# Altium PCB Main.PcbDoc
Units mm, origin at the board's own origin, x right, y up, seen from the top; angles counter-clockwise.
Board outline 40 x 50 mm, 2 copper layers (Top Layer, Bottom Layer), stack 1.135 mm thick; 38 components, 19 nets, 113 pads, 127 vias.
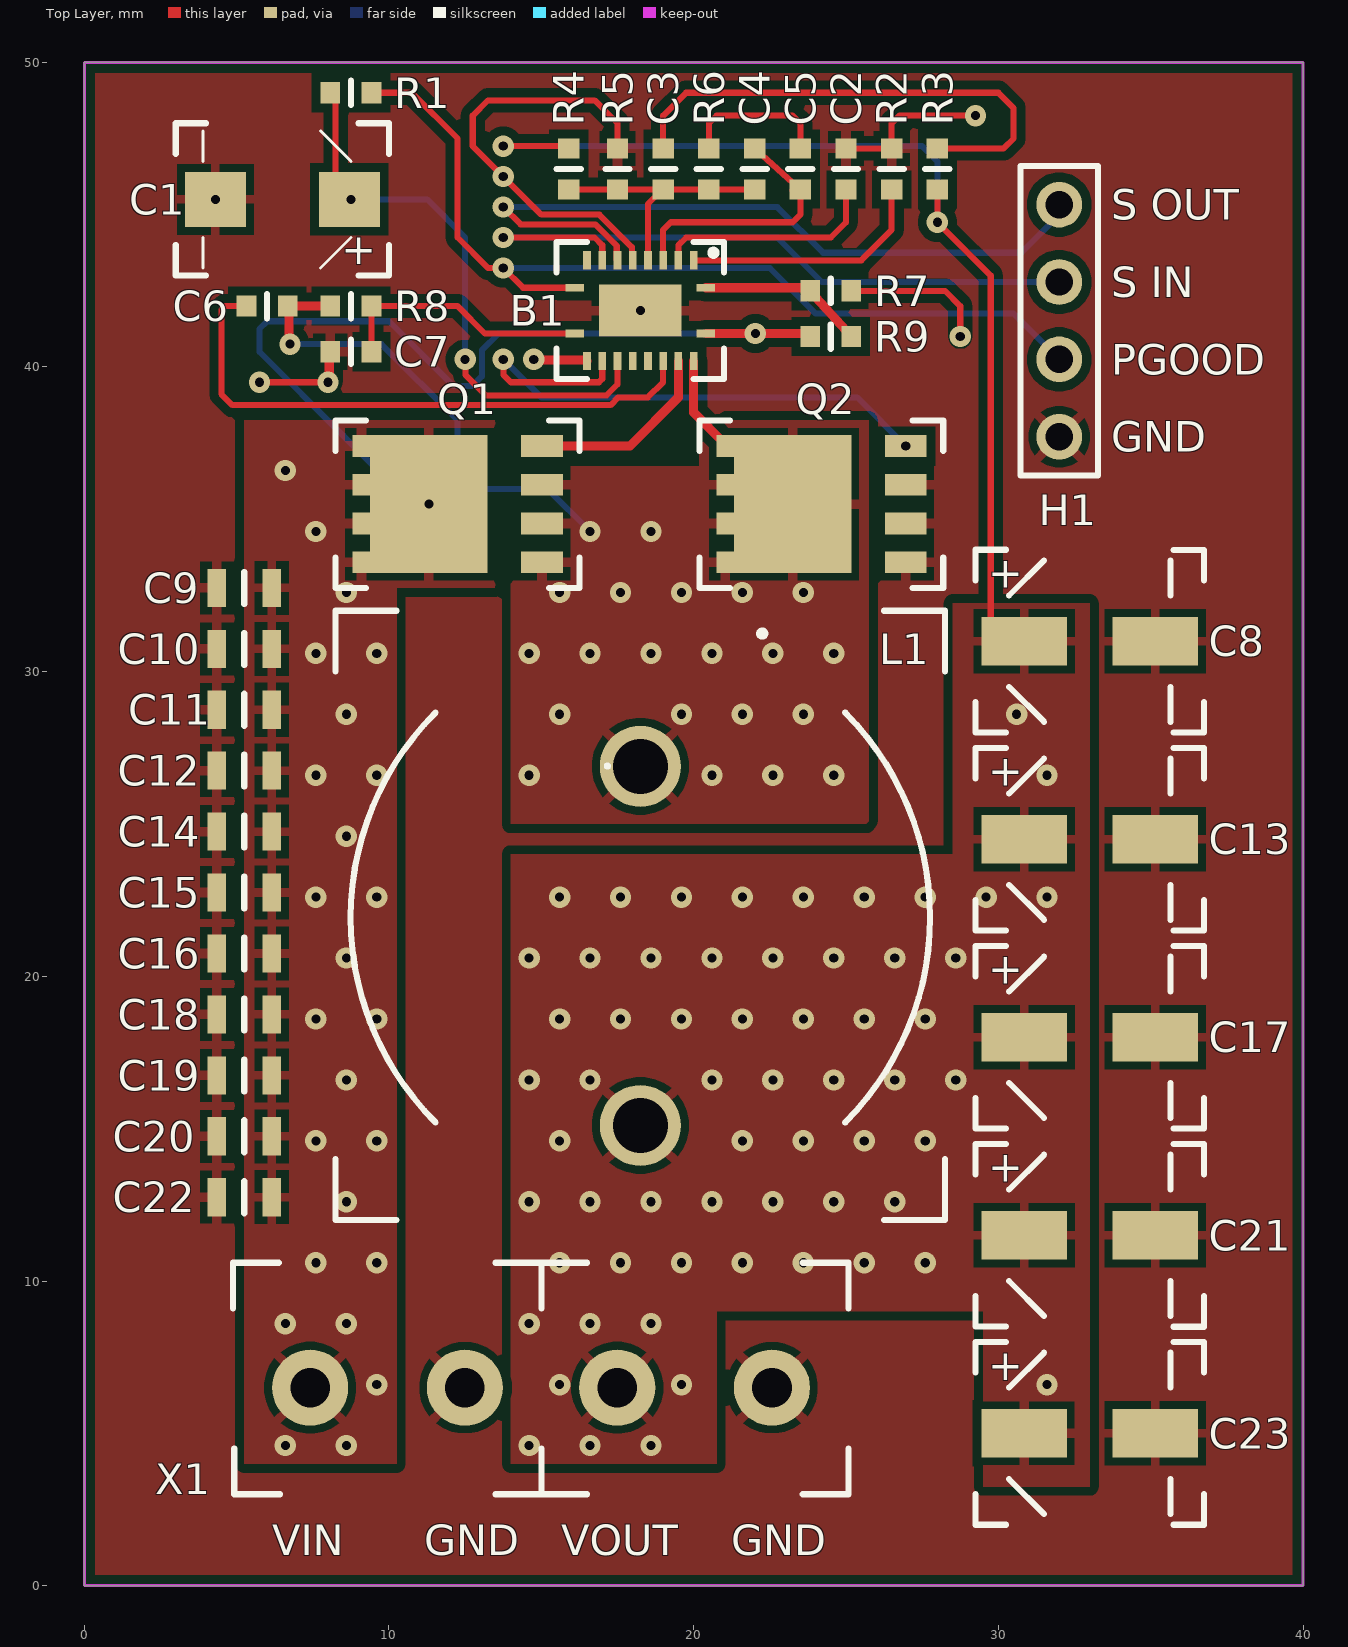
[diagram p0: Top Layer view]
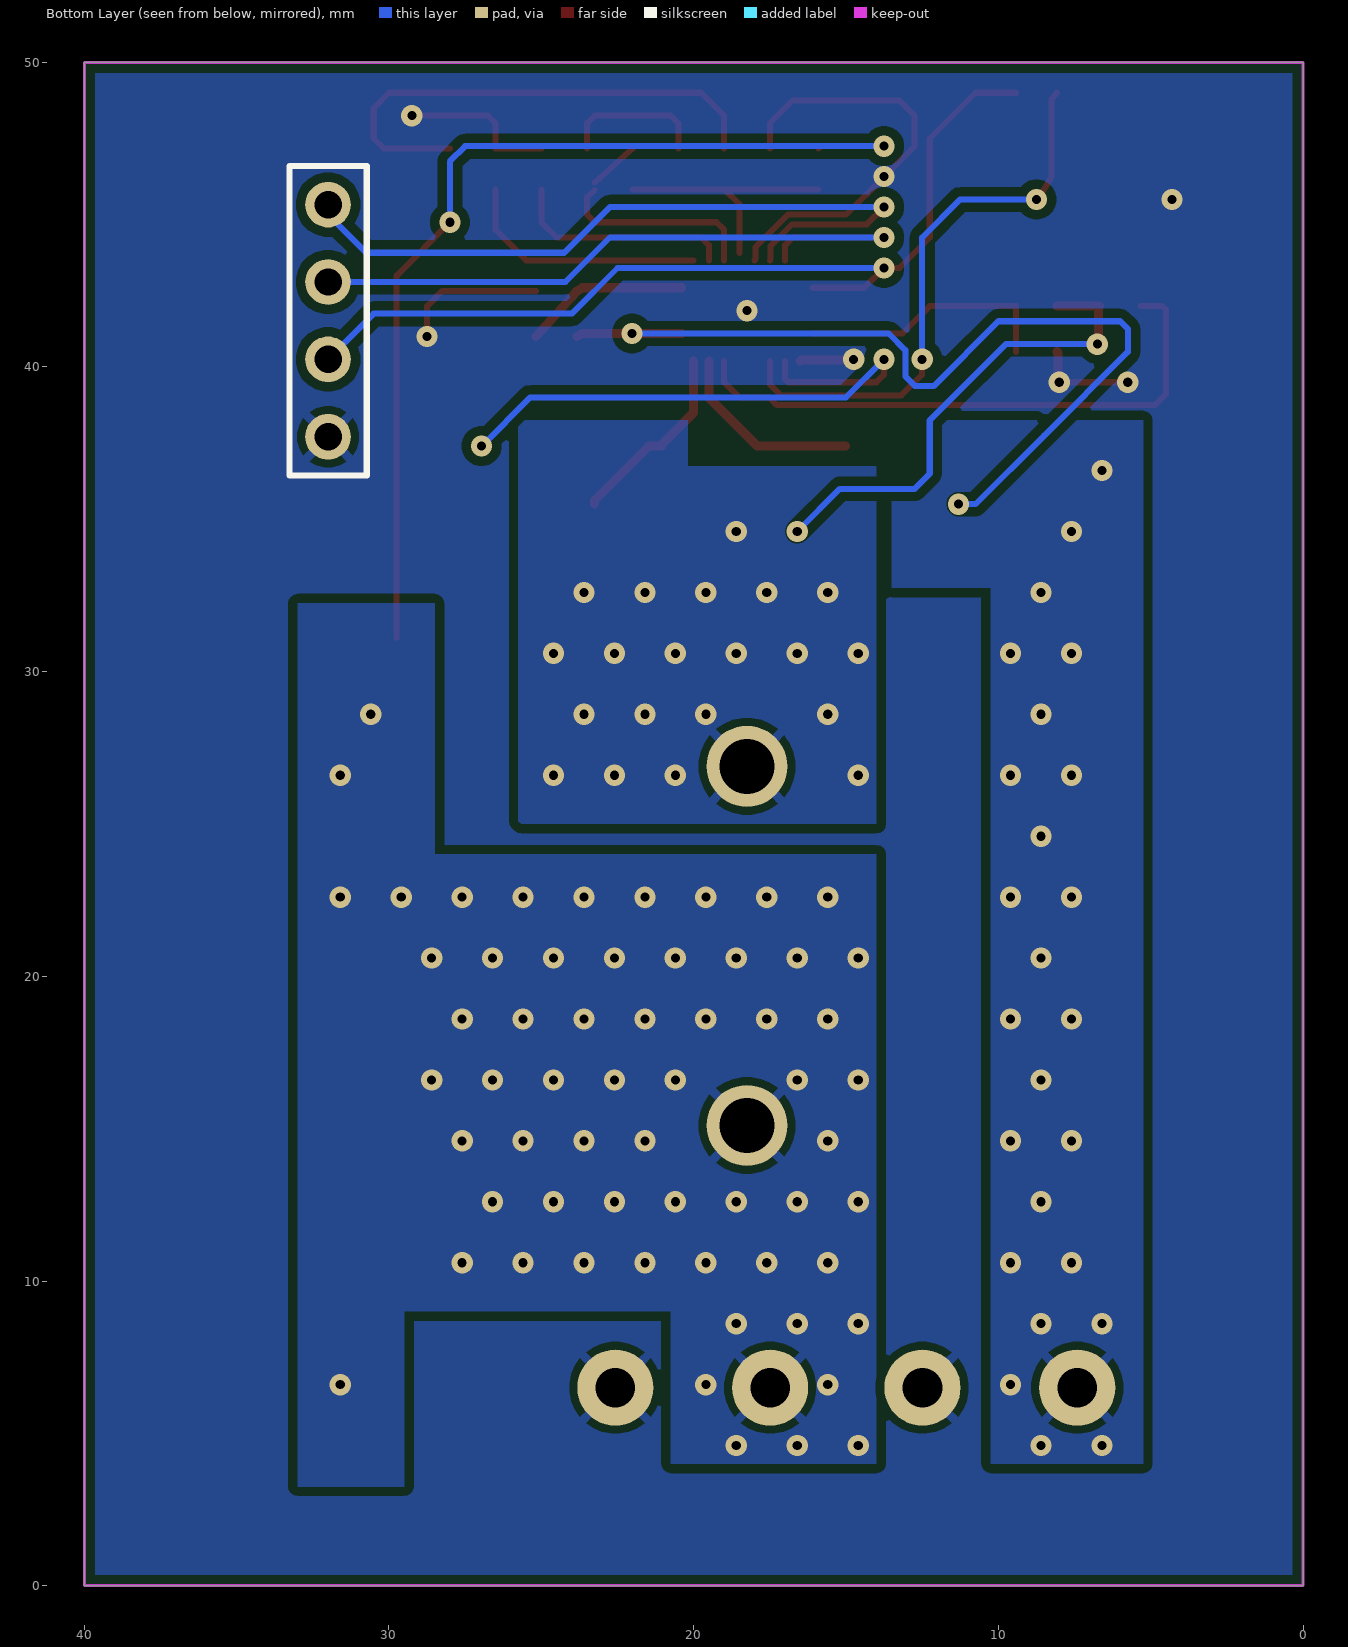
[diagram p1: Bottom Layer view, seen from below]

## Layer stack, top to bottom
Top Solder: solder mask 0.0102, Solder Resist, Dk 3.8
Top Layer: signal copper 0.035
Dielectric 1: dielectric 1.065, FR-4, Dk 4.8
Bottom Layer: signal copper 0.035
Bottom Solder: solder mask 0.0102, Solder Resist, Dk 3.8

## Board outline
0,0 0,50 40,50 40,0

## Design rules (kind name [scope] priority, off if disabled: settings)
BoardOutlineClearance [All] p1: gap=0.2 ignorepadtopadclearanceinfootprint=FALSE
Clearance "inPolygon Clearance" [InPolygon] p1: gap=0.3 ignorepadtopadclearanceinfootprint=TRUE // this rule ensures that every net within a polygon of a different net has a set clearance from the poly
Clearance "Different Diff Pair" [All] p2: gap=0.2 ignorepadtopadclearanceinfootprint=TRUE
Clearance "Same Diff Pair" [All] p3: gap=0.1 ignorepadtopadclearanceinfootprint=TRUE
Clearance "Different Nets" [not InAnyDifferentialPair] p4: gap=0.3 ignorepadtopadclearanceinfootprint=TRUE except(0.1: Arc-SMDPad Arc-THPad Arc-Via Arc-Text Track-SMDPad Track-THPad Track-Via Track-Text SMDPad-Text THPad-Text Via-Text Fill-Text Poly-Text Region-Text Text-Text; 0.12: Arc-Arc Arc-Track Track-Track; 0.15: SMDPad-SMDPad SMDPad-THPad SMDPad-Via THPad-THPad THPad-Via Via-Via; 0.2: Arc-Hole Track-Hole SMDPad-Hole THPad-Hole Via-Hole Fill-Hole Poly-Hole Region-Hole Text-Hole)
Clearance "Same Net" [not InAnyDifferentialPair] p5: gap=0 ignorepadtopadclearanceinfootprint=TRUE except(0.1: THPad-Via; 0.18: Arc-Arc Arc-Track Track-Track)
ComponentClearance [All] p1: gap=0.102 collisioncheckmode=3 verticalgap=0.102 showdistances=TRUE
DiffPairsRouting "Ethernet Routing" [InDifferentialPairClass('Ethernet_Pairs')] p1: maxlimit=0.2 minlimit=0.2 mostfreqgap=0.2 toplayer_minwidth=0.25 toplayer_maxwidth=0.25 toplayer_prefwidth=0.25 bottomlayer_minwidth=0.25 bottomlayer_maxwidth=0.25 bottomlayer_prefwidth=0.25 impedanceprofiledriven=TRUE maxuncoupledlength=12.7
DiffPairsRouting "USB Routing" [InDifferentialPairClass('USB_Pairs')] p2: maxlimit=0.127 minlimit=0.127 mostfreqgap=0.127 toplayer_minwidth=0.23 toplayer_maxwidth=0.23 toplayer_prefwidth=0.23 bottomlayer_minwidth=0.23 bottomlayer_maxwidth=0.23 bottomlayer_prefwidth=0.23 impedanceprofiledriven=TRUE maxuncoupledlength=12.7
DiffPairsRouting "CAN Routing" [InDifferentialPairClass('CAN_Pairs')] p3: maxlimit=0.5 minlimit=0.5 mostfreqgap=0.5 toplayer_minwidth=0.201 toplayer_maxwidth=0.201 toplayer_prefwidth=0.201 bottomlayer_minwidth=0.201 bottomlayer_maxwidth=0.201 bottomlayer_prefwidth=0.201 impedanceprofiledriven=TRUE maxuncoupledlength=12.7
Height [All] p1: minheight=0 maxheight=1816.048 prefheight=12.7
HoleSize [All] p1: absolutevalues=TRUE maxlimit=20 minlimit=0.3 maxpercent=80.000 minpercent=20.000
HoleToHoleClearance [All] p1: gap=0.25 allowstackedmicrovias=FALSE
Length [All] p1: maxlimit=43.432 minlimit=0 usedelayunits=TRUE mindelay=0.000000 maxdelay=10000.000000
MatchedLengths "Diff Pair Matched Delays" [InDifferentialPairClass('Ethernet_Pairs') or InDifferentialPairClass('USB_Pairs') or InDifferentialPairClass('CAN_Pairs')] p1: tolerance=5 checknetsindiffpair=TRUE checkdiffpairvsdiffpair=FALSE checkxsignals=FALSE checkothers=FALSE usedelayunits=TRUE delaytolerance=100.000000
MinimumAnnularRing [All] p1: minimumring=0.2
MinimumSolderMaskSliver [All] p1: minsoldermaskwidth=0
PlaneClearance "Supply Net Clearance" [InNetClass('Supply_Nets')] p1: clearance=0.5
PlaneClearance "All Nets" [All] p2: clearance=0.3
PolygonConnect "Supply Nets" [InNetClass('Supply_Nets')] p1: thpad.connectstyle=Relief thpad.reliefconductorwidth=0.3 thpad.reliefentries=4 thpad.polygonreliefangle="90 Angle" thpad.airgapwidth=0.254 thpad.conductorbypadedge=TRUE thpad.mindistance=0.381 thpad.enablemindistance=FALSE smdpad.connectstyle=Relief smdpad.reliefconductorwidth=0.3 smdpad.reliefentries=4 smdpad.polygonreliefangle="90 Angle" smdpad.airgapwidth=0.254 smdpad.conductorbypadedge=TRUE smdpad.mindistance=0.381 smdpad.enablemindistance=FALSE via.connectstyle=Direct via.reliefconductorwidth=0.3 via.reliefentries=4 via.polygonreliefangle="90 Angle" via.airgapwidth=0.254
PolygonConnect General [All] p2: connectstyle=Relief reliefconductorwidth=0.254 reliefentries=4 polygonreliefangle="90 Angle" airgapwidth=0.254
RoutingVias [All] p1: holewidth=0.2 width=0.35 viastyle="Through Hole" minholewidth=0.15 minwidth=0.3 maxholewidth=6.3 maxwidth=6.55
SilkToSilkClearance [All] p1: silktosilkclearance=0
SilkToSolderMaskClearance [All] p1: minsilkscreentomaskgap=0 clearancetoexposedcopper=TRUE
SolderMaskExpansion [All] p1: expansion=0.075 istentingtop=FALSE
SupplyNets "Schematic Supply Nets_3" [InNet('GND')] p1: voltage=0.000
UnRoutedNet [All] p1: checkbadconnections=TRUE
Width "nRF Width" [InNetClass('nRF Signal')] p1: maxlimit=0.379 minlimit=0.379 preferedwidth=0.379 impedanceprofiledriven=TRUE minimp=50.000000 maximp=50.000000 favimp=50.000000 checkconnectedcopper=TRUE
Width [All] p2: maxlimit=100 minlimit=0.1 preferedwidth=0.3
20 further rules are at their usual default settings.

## Classes and differential pairs
net class Supply_Nets: GND NetB1_13 NetB1_18 NetB1_19 VIN VOUT

## Components (designator, comment, footprint, x,y, rotation, side; value= is the part's Value field where it differs from the comment)
B1 "[Buck Controller] 6-75V Buck Controller" "[Buck Controller] 6-75V Buck Controller" 18.25,41.85 r270 top
C1 "[Cap] 4mm 2.2uF 20% 50V" "[Cap] SMD Polarized, 4mm" 6.5,45.5 r180 top
C2 "[Cap] 0603 47nF 10% 50V" "[Cap] SMD 0603" 25,46.5 r270 top
C3 "[Cap] 0603 1200pF 5% 50V" "[Cap] SMD 0603" 19,46.5 r90 top
C4 "[Cap] 0603 220pF 10% 50V" "[Cap] SMD 0603" 22,46.5 r90 top
C5 "[Cap] 0603 4700pF 5% 50V" "[Cap] SMD 0603" 23.5,46.5 r270 top
C6 "[Cap] 0603 0.1uF 10% 16V" "[Cap] SMD 0603" 6,42 r0 top
C7 "[Cap] 0603 12pF 5% 50V" "[Cap] SMD 0603" 8.75,40.5 r0 top
C8 "[Cap] 5mm 47uF 20% 35V" "[Cap] SMD Polarized, 5mm" 33,31 r0 top (schematic designator C10)
C9 "[Cap] 0805 4.7uF 10% 50V" "[Cap] SMD 0805" 5.25,32.75 r0 top (schematic designator C8)
C10 "[Cap] 0805 4.7uF 10% 50V" "[Cap] SMD 0805" 5.25,30.75 r0 top (schematic designator C9)
C11 "[Cap] 0805 4.7uF 10% 50V" "[Cap] SMD 0805" 5.25,28.75 r0 top
C12 "[Cap] 0805 4.7uF 10% 50V" "[Cap] SMD 0805" 5.25,26.75 r0 top
C13 "[Cap] 5mm 47uF 20% 35V" "[Cap] SMD Polarized, 5mm" 33,24.5 r0 top (schematic designator C14)
C14 "[Cap] 0805 4.7uF 10% 50V" "[Cap] SMD 0805" 5.25,24.75 r0 top (schematic designator C13)
C15 "[Cap] 0805 4.7uF 10% 50V" "[Cap] SMD 0805" 5.25,22.75 r0 top
C16 "[Cap] 0805 4.7uF 10% 50V" "[Cap] SMD 0805" 5.25,20.75 r0 top
C17 "[Cap] 5mm 47uF 20% 35V" "[Cap] SMD Polarized, 5mm" 33,18 r0 top (schematic designator C18)
C18 "[Cap] 0805 4.7uF 10% 50V" "[Cap] SMD 0805" 5.25,18.75 r0 top (schematic designator C17)
C19 "[Cap] 0805 4.7uF 10% 50V" "[Cap] SMD 0805" 5.25,16.75 r0 top
C20 "[Cap] 0805 4.7uF 10% 50V" "[Cap] SMD 0805" 5.25,14.75 r0 top
C21 "[Cap] 5mm 47uF 20% 35V" "[Cap] SMD Polarized, 5mm" 33,11.5 r0 top
C22 "[Cap] 0805 4.7uF 10% 50V" "[Cap] SMD 0805" 5.25,12.75 r0 top
C23 "[Cap] 5mm 47uF 20% 35V" "[Cap] SMD Polarized, 5mm" 33,5 r0 top
H1 "1x4 Header" "[Header] 1x4 Male" 32,41.52 r270 top
L1 "[3.3uH] Thru-Hole 40A 2.4mOhm" "[Inductor] 19.18mm Diameter" 18.25,22 r270 top
Q1 "CSD18563Q5A" 8-VSON 12.25,35.5 r0 top
Q2 "CSD18532Q5B" 8-VSON 24.191,35.5 r0 top
R1 "[20k] SMD 0603 1% 1/10W" "[Res] SMD 0603" 8.75,49 r0 top
R2 "[44.2k] SMD 0603 1% 1/10W" "[Res] SMD 0603" 26.5,46.5 r270 top
R3 "[158] SMD 0603 1% 1/10W" "[Res] SMD 0603" 28,46.5 r270 top
R4 "[22.1k] SMD 0603 1% 1/10W" "[Res] SMD 0603" 15.9,46.5 r90 top
R5 "[4.22k] SMD 0603 1% 1/10W" "[Res] SMD 0603" 17.5,46.5 r270 top
R6 "[7.15k] SMD 0603 1% 1/10W" "[Res] SMD 0603" 20.5,46.5 r90 top
R7 "[14.7k] SMD 0603 1% 1/10W" "[Res] SMD 0603" 24.5,42.5 r0 top
R8 "[392] SMD 0603 1% 1/10W" "[Res] SMD 0603" 8.75,42 r0 top
R9 "[402k] SMD 0603 1% 1/10W" "[Res] SMD 0603" 24.5,41 r180 top
X1 "4pin Screw Terminal" "[Screw Terminal] 4pin 5mm" 15,6.5 r0 top

## Footprints (in the part's own frame and the unit in brackets; to place one, negate y for a bottom-side part, rotate by r counter-clockwise, add the part's x,y. Pads: shape width x height; smd on the part's side, far side on the other; paste and mask are expansions set on the pad)
8-VSON [mm]
  rect 1.372x0.71 smd: 1(2.77,-1.905) 1(2.77,-0.635) 1(2.77,0.635)
  rect 1.375x0.71 smd: 2(2.77,1.905)
  rect 0.59x0.71 smd: 3(-3.151,-1.905) 3(-3.151,-0.635) 3(-3.151,0.635) 3(-3.151,1.905)
  rect 3.85x4.52 smd: 3(-0.941,0)
  silkscreen extent -4,-2.75 4,2.75, body extent -3.39,-2.5 3.39,2.5, height 1.15
"[Buck Controller] 6-75V Buck Controller" [mm] "LM5145RGYR"
  rect 0.25x0.6 smd: 1(-0.75,2.15) 10(-0.75,-2.15) 11(0.75,-2.15) 20(0.75,2.15)
  rect 0.6x0.25 smd: 2(-1.65,1.75) 3(-1.65,1.25) 4(-1.65,0.75) 5(-1.65,0.25) 6(-1.65,-0.25) 7(-1.65,-0.75) 8(-1.65,-1.25) 9(-1.65,-1.75) 12(1.65,-1.75) 13(1.65,-1.25) 14(1.65,-0.75) 15(1.65,-0.25) 16(1.65,0.25) 17(1.65,0.75) 18(1.65,1.25) 19(1.65,1.75)
  rect 1.7x2.7 smd: 21(0,0)
  silkscreen extent -2.25,-2.75 2.25,2.75, body extent -1.75,-2.25 1.75,2.25, height 1
"[Cap] SMD 0603" [mm]
  rect 0.65x0.7 smd: 1(-0.675,0) 2(0.675,0)
  silkscreen extent 0,-0.4 0,0.4, body extent -0.8,-0.45 0.8,0.45, height 0.8
"[Cap] SMD 0805" [mm]
  rect 0.6x1.25 smd: 1(-0.9,0) 2(0.9,0)
  silkscreen extent 0,-0.53 0,0.53, body extent -1,-0.63 1,0.63, height 1
"[Cap] SMD Polarized, 4mm" [mm]
  rect 2x1.8 smd: 1(-2.2,0) 2(2.2,0)
  silkscreen extent -3.5,-2.5 3.5,2.5, body extent -2.6,-2.25 2.6,2.25, height 5.66
"[Cap] SMD Polarized, 5mm" [mm]
  rect 2.8x1.6 smd: 1(-2.15,0) 2(2.15,0)
  silkscreen extent -3.75,-3 3.75,3, body extent -3,-2.65 3,2.65, height 5.8
"[Header] 1x4 Male" [mm] "2.54mm pitch"
  round 1.5 hole 0.9: 1(-3.81,0) 2(-1.27,0) 3(1.27,0) 4(3.81,0)
  silkscreen extent -5.08,-1.27 5.08,1.27, body extent -5.08,-1.27 5.08,1.27, height 9.5
"[Inductor] 19.18mm Diameter" [mm]
  round 2.66 hole 1.8: 1(-4.892,0) 2(6.894,0)
  silkscreen extent -10,-10 10,10, body extent -9.58,-9.59 9.58,9.59, height 8.85
"[Res] SMD 0603" [mm]
  rect 0.65x0.7 smd: 1(-0.675,0) 2(0.675,0)
  silkscreen extent 0,-0.4 0,0.4, body extent -0.8,-0.45 0.8,0.45, height 0.8
"[Screw Terminal] 4pin 5mm" [mm]
  round 2.5 hole 1.3: 1(-7.59,0) 2(-2.51,0) 3(2.49,0) 4(7.57,0)
  silkscreen extent -10.12,-3.5 10.08,4.1, body extent -10.5,-3.5 10.08,4.1, height 9.99

## Part data
B1: "LM5145RGYR", Supplier Part Number 1=296-47661-1-ND, Supplier 1=DigiKey
C1: "EEE-HB1H2R2R", Capacitance=2.2uF, Max Voltage=50V, Size Package=4mm, Supplier Part Number 1=667-EEE-HB1H2R2R, Tolerance=20%, Supplier 1=Mouser
C2: "C0603C221K5RACTU", Capacitance=47nF, Max Voltage=50V, Size Package=0603, Supplier Part Number 1=1276-1063-1-ND, Tolerance=10%, Supplier 1=DigiKey
C3: "GRM1885C1H122JA01D", Capacitance=1200pF, Max Voltage=50V, Size Package=0603, Supplier Part Number 1=490-1453-1-ND, Tolerance=5%, Supplier 1=DigiKey
C4: "C0603C221K5RACTU", Capacitance=220pF, Max Voltage=50V, Size Package=0603, Supplier Part Number 1=399-C0603C221K5RACTUCT-ND, Tolerance=10%, Supplier 1=DigiKey
C5: "GRM1885C1H472JA01D", Capacitance=4700pF, Max Voltage=50V, Size Package=0603, Supplier Part Number 1=490-9669-6-ND, Tolerance=5%, Supplier 1=DigiKey
C6: "CC0603KRX7R7BB104", Capacitance=100nF, Max Voltage=16V, Size Package=0603, Supplier Part Number 1=311-1088-6-ND, Tolerance=10%, Supplier 1=DigiKey
C7: "C0603C120J5GACTU", Capacitance=220pF, Max Voltage=50V, Size Package=0603, Supplier Part Number 1=399-C0603C120J5GACTUCT-ND, Tolerance=10%, Supplier 1=DigiKey
C8 C13 C17 C21 C23: "UCM1V470MCL1GS", Capacitance=47uF, Max Voltage=35V, Size Package=5mm, Supplier Part Number 1=493-14540-1-ND, Tolerance=20%, Supplier 1=DigiKey
C9 C10 C11 C12 C14 C15 C16 C18 C19 C20 C22: "GRT21BR61H475KE13L", Capacitance=4.7uF, Max Voltage=50V, Size Package=0805, Supplier Part Number 1=490-12394-1-ND, Tolerance=10%, Supplier 1=DigiKey
H1: library part "[Header] 1x4 Male", "2.54mm pitch"
L1: "IHTH0750IZEB3R3M5A", Inductance=3.3uH, Package=Thru-Hole, Supplier Part Number 1=IHTH0750IZEB3R3M5A-ND, Supplier 1=DigiKey
Q1: library part "[NMOS] SMD 60V 100A (A)", Supplier Part Number 1=296-36511-1-ND, Supplier 1=DigiKey
Q2: library part "[NMOS] SMD 60V 100A (B)", Supplier Part Number 1=296-46414-1-ND, Supplier 1=DigiKey
R1: "RC0603FR-0720KL", Resistance=20k, Size Package=0603, Supplier Part Number 1=311-20.0KHRCT-ND, Tolerance=1%, Supplier 1=DigiKey, Wattage=1/10W
R2: "RC0603FR-0744K2L", Resistance=44.2k, Size Package=0603, Supplier Part Number 1=311-44.2KHRCT-ND, Tolerance=1%, Supplier 1=DigiKey, Wattage=1/10W
R3: "RC0603FR-07158RL", Resistance=158, Size Package=0603, Supplier Part Number 1=311-158HRCT-ND, Tolerance=1%, Supplier 1=DigiKey, Wattage=1/10W
R4: "RC0603FR-0722K1L", Resistance=22.1k, Size Package=0603, Supplier Part Number 1=311-22.1KHRCT-ND, Tolerance=1%, Supplier 1=DigiKey, Wattage=1/10W
R5: "RMCF0603FT4K22", Resistance=4.22k, Size Package=0603, Supplier Part Number 1=RMCF0603FT4K22CT-ND, Tolerance=1%, Supplier 1=DigiKey, Wattage=1/10W
R6: "RMCF0603FT7K15", Resistance=7.15k, Size Package=0603, Supplier Part Number 1=RMCF0603FT7K15CT-ND, Tolerance=1%, Supplier 1=DigiKey, Wattage=1/10W
R7: "RMCF0603FT14K7", Resistance=14.7k, Size Package=0603, Supplier Part Number 1=RMCF0603FT14K7CT-ND, Tolerance=1%, Supplier 1=DigiKey, Wattage=1/10W
R8: "RC0603FR-07392RL", Resistance=392, Size Package=0603, Supplier Part Number 1=311-392HRCT-ND, Tolerance=1%, Supplier 1=DigiKey, Wattage=1/10W
R9: "RC0603FR-07402KL", Resistance=402k, Size Package=0603, Supplier Part Number 1=311-402KHRCT-ND, Tolerance=1%, Supplier 1=DigiKey, Wattage=1/10W
X1: library part "[Screw Terminal] 4pin", "TB002-500-04BE", Supplier Part Number 1=102-6147-ND, Supplier 1=DigiKey

## Via types
v1: diameter 0.7, hole 0.3, Top Layer to Bottom Layer, 127 vias

## Nets (pads, with @x,y where several pads share a name; then routed paths per layer and width w, separated by ;. In a path a pad name is that pad's centre, name@x,y a point inside that pad or via, vN(x,y) a via of type N, cw(c..) or ccw(c..) an arc to the next point about the centre after c; other vN are vias at no path point)
COMP: B1.4 C4.2 C5.2 | length 8.3
  Top Layer w0.2: B1.4 19,44.5 19.25,44.75 23.25,44.75 23.5,45 23.5,45.575 C5.2@23.25,45.8 ; C4.2 22.25,46.95 C5.2@23.25,46.05
FB: B1.5 C3.1 C4.1 R4.1 R5.2 R6.1 | length 8.4
  Top Layer w0.2: R4.1 R5.2 C3.1 ; B1.5@18.5,43.75 18.5,45.35 18.975,45.825 C3.1 ; C4.1 R6.1 C3.1
GND: B1.6 B1.12 B1.21 C1.2 C2.1 C7.1 C8.2 C9.1 C10.1 C11.1 C12.1 C13.2 C14.1 C15.1 C16.1 C17.2 C18.1 C19.1 C20.1 C21.2 C22.1 C23.2 H1.4 Q2.1 R2.1 R5.1 R7.2 X1.2 X1.4 | length 29.1
  Top Layer w0.2: v1(5.75,39.5) v1(8,39.5) ; R5.1 17.5,48 16.75,48.75 13.25,48.75 12.75,48.25 12.75,47.25 v1(13.75,46.25) 15,45 16.905,45 17.975,43.93 17.975,43.525 B1.6 ; C2.1 R2.1 26.5,48 26.75,48.25 v1(29.25,48.25) ; R7.2 28.25,42.5 28.75,42 v1(28.75,41)
  Top Layer w0.3: v1(8,39.5) 8.037,39.538 8.037,40.462 C7.1 ; v1(14.75,40.25) 14.775,40.225 16.475,40.225 B1.12
  other v1: 18.25,41.85 4.3,45.5
NetB1_1: B1.1 R7.1 R9.1 | length 5.5
  Top Layer w0.3: B1.1 23.65,42.6 R7.1 24,42.3 25,41.2 R9.1
NetB1_11: B1.11 C7.2 R8.2 | length 8.5
  Top Layer w0.2: C7.2 R8.2 12.25,42 13.15,41.1 B1.11
NetB1_13: B1.13 Q2.2 | length 18.9
  Top Layer w0.2: v1(13.75,40.25) 13.755,40.245 13.755,39.745 14,39.5 16.889,39.5 17,39.611 B1.13
  Bottom Layer w0.2: v1(13.75,40.25) 15,39 25.366,39 v1(26.961,37.405)
NetB1_14: B1.14 C1.1 R1.1 | length 18.7
  Top Layer w0.2: R1.1 8.25,48.8 8.25,46.25 C1.1 ; v1(12.5,40.25) 12.505,40.245 12.505,39.745 13.18,39.07 17.139,39.07 17.5,39.431 B1.14
  Bottom Layer w0.2: v1(8.75,45.5) 11.25,45.5 12.5,44.25 v1(12.5,40.25)
NetB1_17: B1.17 C6.1 | length 19.3
  Top Layer w0.2: C6.1 4.611,42 4.5,41.889 4.5,39.111 4.861,38.75 17.271,38.75 17.521,39 18.5,39 19,39.5 B1.17
NetB1_18: B1.18 Q1.2 | length 6.3
  Top Layer w0.3: Q1.2 17.905,37.405 19.5,39 B1.18
NetB1_19: B1.19 C6.2 L1.1 Q1.1 Q2.3 R8.1 | length 22.4
  Top Layer w0.3: v1(6.75,40.75) 6.713,40.787 6.713,41.962 C6.2 R8.1 ; B1.19 20,38.505 21.04,37.465 21.04,37.405 21.475,37.405 23.25,35.63 Q2.3@23.25,35.5
  Bottom Layer w0.2: v1(6.75,40.75) 9.75,40.75 12.25,38.25 12.25,36.5 12.75,36 15.2,36 v1(16.6,34.6)
  other v1: 14.6,26.6 20.6,26.6 22.6,26.6 24.6,26.6 15.6,28.6 19.6,28.6 21.6,28.6 23.6,28.6 14.6,30.6 16.6,30.6 18.6,30.6 20.6,30.6 22.6,30.6 24.6,30.6 15.6,32.6 17.6,32.6 19.6,32.6 21.6,32.6 23.6,32.6 18.6,34.6
NetC3_2: C3.2 R3.1 | length 16.7
  Top Layer w0.2: C3.2 19,48.25 19.75,49 30,49 30.5,48.5 30.5,47.5 30.175,47.175 R3.1
NetC5_1: C5.1 R6.2 | length 4.9
  Top Layer w0.2: R6.2 20.5,48 20.75,48.25 23.25,48.25 23.5,48 C5.1
PGOOD: B1.10 H1.3 R1.2 | length 30.7
  Top Layer w0.2: R1.2 10.75,49 12.25,47.5 12.25,44.25 13.245,43.255 13.745,43.255 v1(13.75,43.25) 14.4,42.6 B1.10
  Bottom Layer w0.2: v1(13.75,43.25) 22.5,43.25 24,41.75 30.5,41.75 H1.3
RT: B1.2 R2.2 | length 8.2
  Top Layer w0.2: B1.2 25.5,43.5 26.5,44.5 R2.2
SS/TRK: B1.3 C2.2 | length 7.4
  Top Layer w0.2: B1.3 19.5,44 19.75,44.25 24.5,44.25 25,44.75 C2.2
SYNCIN: B1.8 H1.2 | length 22.7
  Top Layer w0.2: v1(13.75,44.25) 16.75,44.25 17,44 B1.8
  Bottom Layer w0.2: v1(13.75,44.25) 22.75,44.25 24.21,42.79 H1.2
SYNCOUT: B1.7 H1.1 | length 24.5
  Top Layer w0.2: v1(13.75,45.25) 14.32,44.68 16.773,44.68 17.475,43.977 17.475,43.525 B1.7
  Bottom Layer w0.2: v1(13.75,45.25) 22.75,45.25 24.25,43.75 30.75,43.75 32,45 H1.1
VIN: B1.20 C9.2 C10.2 C11.2 C12.2 C14.2 C15.2 C16.2 C18.2 C19.2 C20.2 C22.2 Q1.3 R9.2 X1.1 | length 30.3
  Top Layer w0.3: B1.20 v1(22.025,41.1) 23.65,41.1 R9.2
  Bottom Layer w0.2: v1(11.309,35.5) 10.75,35.5 8.5,37.75 5.75,40.5 5.75,41.25 6,41.5 10,41.5 12.125,39.375 12.731,39.375 13.05,39.694 13.05,40.55 13.6,41.1 v1(22.025,41.1)
  other v1: 6.6,4.6 8.6,4.6 9.6,6.6 6.6,8.6 8.6,8.6 7.6,10.6 9.6,10.6 8.6,12.6 7.6,14.6 9.6,14.6 8.6,16.6 7.6,18.6 9.6,18.6 8.6,20.6 7.6,22.6 9.6,22.6 8.6,24.6 7.6,26.6 9.6,26.6 8.6,28.6 7.6,30.6 9.6,30.6 8.6,32.6 7.6,34.6 6.6,36.6
VOUT: C8.1 C13.1 C17.1 C21.1 C23.1 L1.2 R3.2 R4.2 X1.3 | length 34.1
  Top Layer w0.2: v1(13.75,47.25) 15.825,47.25 R4.2 ; R3.2 v1(28,44.75) 29.75,43 C8.1@29.75,31.1
  Bottom Layer w0.2: v1(13.75,47.25) 27.5,47.25 28,46.75 v1(28,44.75)
  other v1: 14.6,4.6 16.6,4.6 18.6,4.6 15.6,6.6 19.6,6.6 31.6,6.6 14.6,8.6 16.6,8.6 18.6,8.6 15.6,10.6 17.6,10.6 19.6,10.6 21.6,10.6 23.6,10.6 25.6,10.6 27.6,10.6 14.6,12.6 16.6,12.6 18.6,12.6 20.6,12.6 22.6,12.6 24.6,12.6 26.6,12.6 15.6,14.6 21.6,14.6 23.6,14.6 25.6,14.6 27.6,14.6 14.6,16.6 16.6,16.6 20.6,16.6 22.6,16.6 24.6,16.6 26.6,16.6 28.6,16.6 15.6,18.6 17.6,18.6 19.6,18.6 21.6,18.6 23.6,18.6 25.6,18.6 27.6,18.6 14.6,20.6 16.6,20.6 18.6,20.6 20.6,20.6 22.6,20.6 24.6,20.6 26.6,20.6 28.6,20.6 15.6,22.6 17.6,22.6 19.6,22.6 21.6,22.6 23.6,22.6 25.6,22.6 27.6,22.6 29.6,22.6 31.6,22.6 31.6,26.6 30.6,28.6
pads on no net: B1.9 B1.15 B1.16

## Polygon pours and split planes (outlines as drawn)
GND on Top Layer "GND Top Poly" (solid, remove dead copper, pour order 20): 0,0 40,0 40,50 0,50
NetB1_19 on Top Layer "Vout_X Poly" (solid, pour order 17): 14,36.75 20.191,36.75 20.191,38.25 25.75,38.25 25.75,25 14,25
VIN on Top Layer "Vin Top Poly" (solid, pour order 18): 5.25,38.25 13.5,38.25 13.5,32.75 10.25,32.75 10.25,4 5.25,4
VOUT on Top Layer "Vout Top Poly" (solid, remove dead copper, pour order 19): 14,24 28.5,24 28.5,32.25 33,32.25 33,3.25 29.5,3.25 29.5,9 20.75,9 20.75,4 14,4
GND on Bottom Layer "GND Bottom Poly" (solid, remove dead copper, pour order 24): 0,0 40,0 40,50 0,50
VOUT on Bottom Layer "Vout Bottom Poly" (solid, remove dead copper, pour order 23): 14,24 28.5,24 28.5,32.25 33,32.25 33,3.25 29.5,3.25 29.5,9 20.75,9 20.75,4 14,4
VIN on Bottom Layer "Vin Bottom Poly" (solid, pour order 22): 5.25,38.25 13.5,38.25 13.5,32.75 10.25,32.75 10.25,4 5.25,4
NetB1_19 on Bottom Layer "Vout_X Bottom Poly" (solid, pour order 21): 14,36.75 20.191,36.75 20.191,38.25 25.75,38.25 25.75,25 14,25

## Keep-outs
Keep-Out Layer:
  the board outline again, w0.1

## Silkscreen, mask and mechanical layers (free items; w line width, h text height)
Top Overlay:
  text "S OUT" at 33.7,44.83 h1
  text "S IN" at 33.7,42.29 h1
  text "PGOOD" at 33.7,39.75 h1
  text "GND" at 33.7,37.21 h1
  text "VIN" at 6.16,1 h1
  text "GND" at 11.157,1 h1
  text "VOUT" at 15.657,1 h1
  text "GND" at 21.237,1 h1
Poly Planning:
  lines w0.1: 20.191,38.25 20.191,36.75 14,36.75 14,25 25.75,25 25.75,38.25 20.191,38.25 ; 20.191,38.25 20.191,38.25 ; 5.25,4 10.25,4 10.25,32.75 13.5,32.75 13.5,38.25 5.25,38.25 5.25,4 ; 14,4 14,24 28.5,24 28.5,32.25 33,32.25 33,3.25 29.5,3.25 29.5,9 22.75,9 20.75,9 20.75,4 14,4

## Text inside footprints (layer, text, board x,y; h text height)
C1: Top Overlay "+" at 9.583,44.25 h1 r180
C8: Top Overlay "+" at 29.667,32.75 h1
C13: Top Overlay "+" at 29.667,26.25 h1
C17: Top Overlay "+" at 29.667,19.75 h1
C21: Top Overlay "+" at 29.667,13.25 h1
C23: Top Overlay "+" at 29.667,6.75 h1